# Altium PCB PCBv2.PcbDoc (part 2 of 2)
Units mil, origin at the board's own origin, x right, y up, seen from the top; angles counter-clockwise.
Board outline 6515 x 2205 mil, 4 copper layers (Top Layer, GND, Power, Bottom Layer), stack 30.8 mil thick; 165 components, 130 nets, 555 pads, 55 vias.
Unrouted connection lines stored in the file: 261.
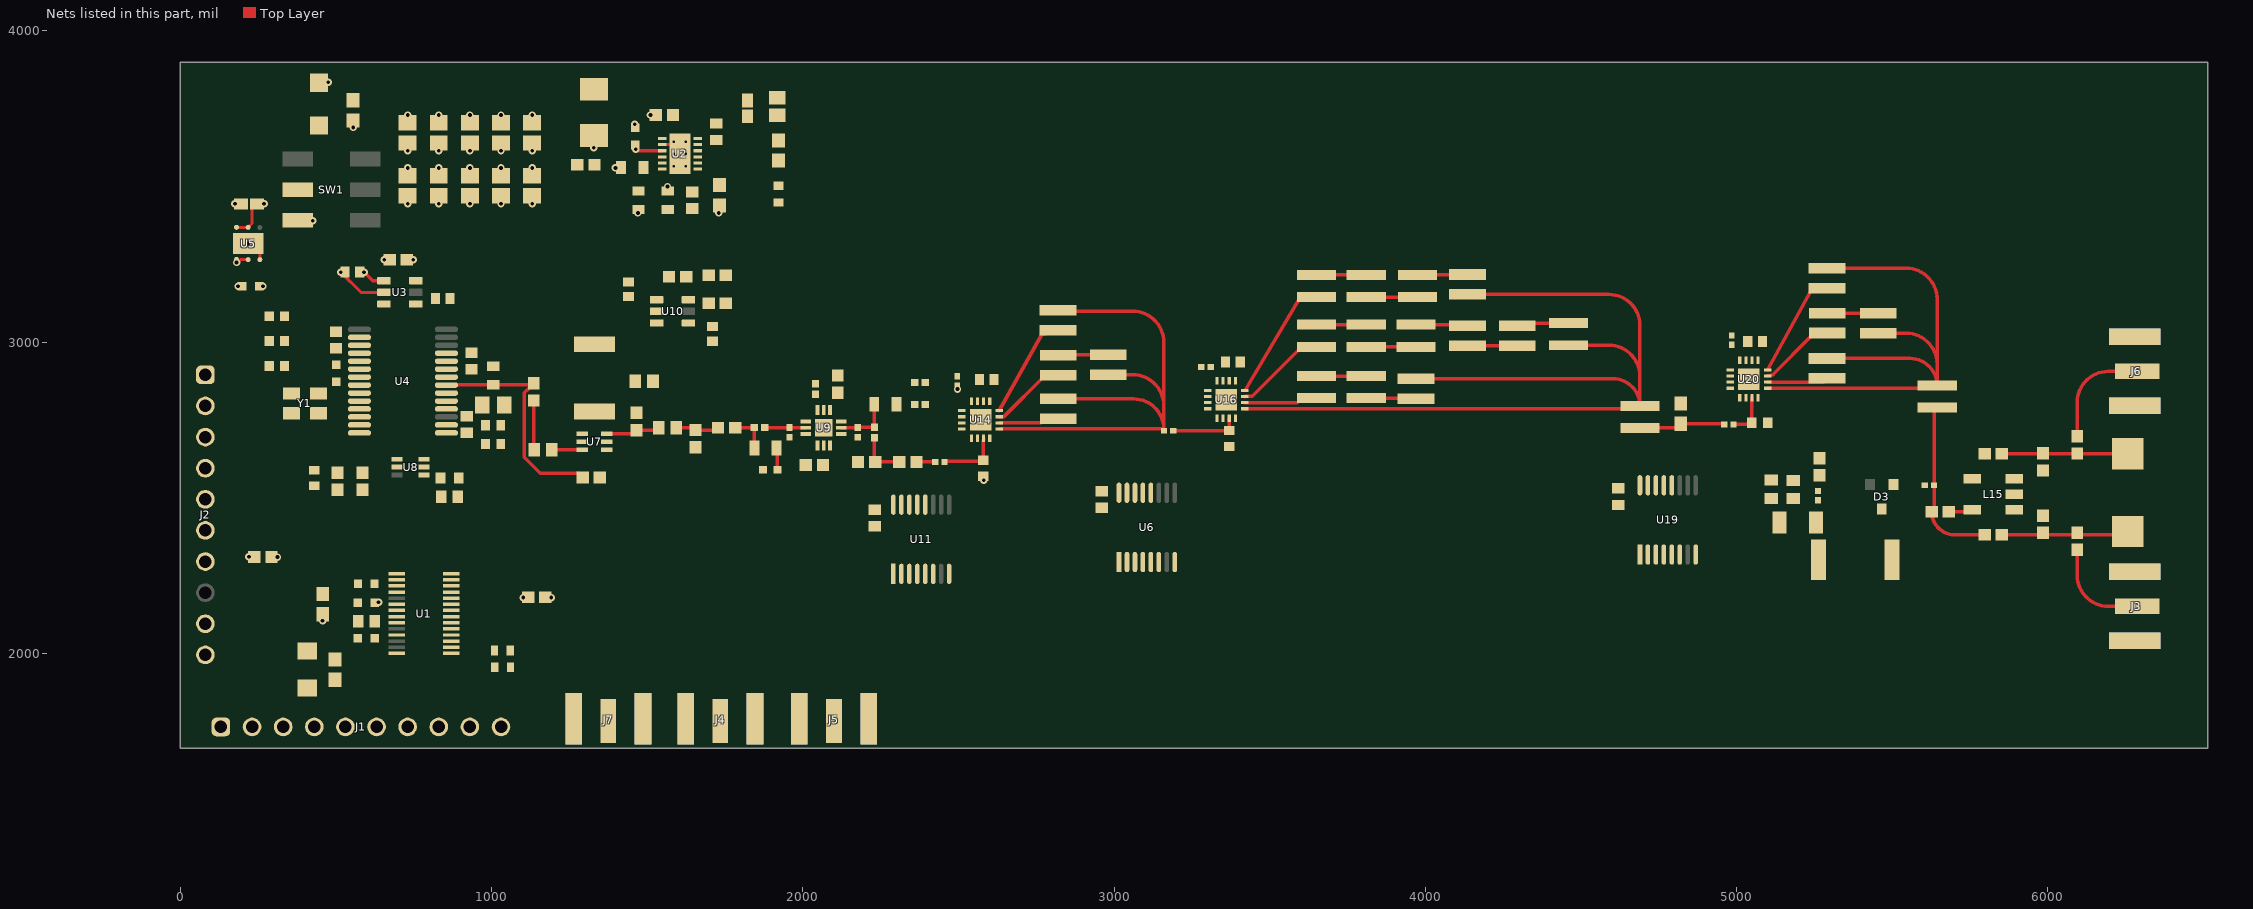
[diagram p4: the nets of this part, all layers, seen from the top]

## Part data (continued)
C10: library part CMP-08246-004908-1, "Multilayer Ceramic Capacitors 4.7μF ±10% 25V X5R SMD 0805", Capacitance=4.7uF, Case Code (Imperial)=0805, Case Code (Metric)=2012, Dielectric=X5R, Dielectric Material=Ceramic, Max Operating Temperature=85°C, Min Operating Temperature=-55°C, Package Quantity=1, Tolerance=10%, Voltage=25V, Case/Package=0805, Depth=1.25mm, Height=1.25mm, Lead Free="Lead Free", Length=2mm, Mount="Surface Mount", Number of Pins=2, Packaging="Tape and Reel", Radiation Hardening=No, REACH SVHC="No SVHC", Resistor Type=Ceramic, RoHS Compliant=Yes, Termination=SMD/SMT, Thickness=0.057inch, Voltage Rating=25V, Voltage Rating (DC)=25V, Weight=0.000194oz, Width=1.25mm
C11 C47: library part CMP-03020-034654-1, "CAP CER 10UF 10V X5R 0603", RoHS Compliant=Yes
C12 C48: library part CMP-03020-014723-2, "CAP CER 100PF 16V NP0 0603", Capacitance="100 pF", Manufacturer=KEMET, Package=C0603C-CF, Temperature="-55°C to +125°C", Temperature Characteristic=C0G, Temperature Coefficient=30ppm/°C, Temperature Range High=+125°C, Temperature Range Low=-55°C, Tolerance=0.1, Voltage Rating="16 V", Automotive=Yes, Automotive Grade="Grade 1", Category=Cap, ComponentLink2Description=Datasheet, ComponentLink2URL=https://api.kemet.com/component-edge/download/datasheet/C0603C100J5GACAUTO.pdf, Device Class L1="Passive Components", Device Class L2=Capacitors, Device Class L3="Ceramic Capacitors", Digikey Description="CAP CER 100PF 16V NP0 0603", Height=0.87mm, Lead Free=Yes, Manufacturer Part Number=C0603C101K4GAC7867, Material=Ceramic, Octopart=https://octopart.com/c0603c101k4gac7867-kemet-1494535, RoHS=TRUE
C16: library part CMP-2006-02564-2, "Chip Multilayer Ceramic Capacitors for General Purpose, 0603, 4700pF, C0G, 30ppm/°C, 5%, 50V", Capacitance=4.7nF, Case Code (Imperial)=0603, Case Code (Metric)=1608, Dielectric=C0G, Max Operating Temperature=125°C, Min Operating Temperature=-55°C, Package Quantity=4000, Tolerance=5%, Voltage Rating=50V, Case/Package=0603, Height=0.8mm, Lead Free="Lead Free", Length=1.6mm, Material=Ceramic, Mount="Surface Mount", Packaging="Tape and Reel", REACH SVHC="No SVHC", Termination=SMD/SMT, Thickness=0.035inch, Voltage Rating (DC)=50V, Width=0.8mm
C21 C26 C28 C29: library part CMP-06035-008289-1, "Chip Multilayer Ceramic Capacitors for General Purpose, 0402, 0.10uF, X5R, 15%, 10%, 100V", Capacitance=100nF, Case Code (Imperial)=0402, Case Code (Metric)=1005, Dielectric=X5R, Max Operating Temperature=85°C, Min Operating Temperature=-55°C, Package Quantity=10000, Tolerance=10%, Voltage Rating=100V, Case/Package=0402, Height=0.5mm, Lead Free="Lead Free", Length=0.039inch, Mount="Surface Mount", Packaging="Tape and Reel", REACH SVHC="No SVHC", Termination=SMD/SMT, Thickness=0.022inch, Voltage Rating (DC)=100V, Weight=0.000212oz, Width=0.5mm
C22: library part CMP-06035-012343-1, "Ceramic Capacitor for Automotive 300pF ±1% 50VDC C0G 0402 Paper T/R"
C27 C43 C46: library part CMP-2008-03723-3, "Ceramic Capacitor for Automotive 10nF ±10% 50VDC X7R 0402 Paper T/R", Capacitance=10nF, Case Code (Imperial)=0402, Case Code (Metric)=1005, Dielectric=X7R, Max Operating Temperature=125°C, Min Operating Temperature=-55°C, Package Quantity=1, Ratings=AEC-Q200, Tolerance=10%, Voltage=50V, Case/Package=0402, Depth=0.5mm, Height=0.5mm, Lead Free="Lead Free", Length=1mm, Mount="Surface Mount", Packaging="Tape and Reel", Radiation Hardening=No, REACH SVHC="No SVHC", Termination=SMD/SMT, Thickness=0.022inch, Voltage Rating=50V, Voltage Rating (DC)=50V, Width=0.02inch
C30 C44 C49: library part CMP-2006-03022-3, "CAP CER 1000PF 50V X7R 0603", Capacitance=1nF, Manufacturer=KEMET, Package=C0603C-CF, Temperature="-55°C to +125°C", Temperature Characteristic=X7R, Temperature Coefficient=30ppm/°C, Temperature Range High=+125°C, Temperature Range Low=-55°C, Tolerance=0.1, Voltage Rating="50 V", Automotive=Yes, Automotive Grade="Grade 1", Category=Cap, ComponentLink2Description=Datasheet, ComponentLink2URL=https://api.kemet.com/component-edge/download/datasheet/C0603C100J5GACAUTO.pdf, Device Class L1="Passive Components", Device Class L2=Capacitors, Device Class L3="Ceramic Capacitors", Digikey Description="CAP CER 1000PF 50V X7R 0603", Height=0.87mm, Lead Free=Yes, Manufacturer Part Number=C0603C102K5RACTU, Material=Ceramic, Mouser Description="Capacitor; Ceramic; Cap; 1000pF; Tol 10%; SMT; Vol-Rtg 50V; X7R; Tape and Reel", Octopart=https://octopart.com/c0603c102k5ractu-kemet-144878, RoHS=TRUE
C32: library part CMP-2006-01326-1, Capacitance=18nF, Manufacturer=Vitramon, Part Number=VJ0603Y183KXAAC
C33 C34: library part CMP-2006-01326-1, Manufacturer=Vitramon, Part Number=VJ0603Y183KXAAC
C35: library part CMP-2100-03600-2, "CAP CER 10000PF 50V X7R 0603", Capacitance="10 nF", Manufacturer=YAGEO, Package=CC0603-DA, Temperature="-55°C to +125°C", Temperature Characteristic=X7R, Temperature Coefficient=15%, Temperature Range High=+125°C, Temperature Range Low=-55°C, Tolerance=0.1, Voltage="50 V", Automotive=No, Category=Cap, ComponentLink2Description=Datasheet, ComponentLink2URL=http://www.yageo.com/documents/recent/UPY-GPHC_X7R_6.3V-to-50V_18.pdf, Device Class L1="Passive Components", Device Class L2=Capacitors, Device Class L3="Ceramic Capacitors", Digikey Description="CAP CER 10000PF 50V X7R 0603", Footprint Url=http://www.yageo.com/exep/pages/download/literatures/UPY-C_GEN_24.pdf, Height=0.9mm, Lead Free=Yes, Manufacturer Part Number=CC0603KRX7R9BB103, Material=Ceramic, Mouser Description="Multilayer Ceramic Capacitor, CC Series, 0.01 - F, - 10%, X7R, 50 V, 0603 [1608 Metric]", Octopart=https://octopart.com/cc0603krx7r9bb103-yageo-192938, RoHS=TRUE, Voltage Rating="50 V"
C36 C37: library part CMP-2008-04639-2, "Chip Multilayer Ceramic Capacitors for General Purpose, 0402, 0.10uF, X7R, 15%, 10%, 50V", Capacitance=100nF, Case Code (Imperial)=0402, Case Code (Metric)=1005, Dielectric=X7R, Dielectric Material=Ceramic, Max Operating Temperature=125°C, Min Operating Temperature=-55°C, Package Quantity=10000, Tolerance=10%, Voltage=50V, Case/Package=0402, Depth=0.5mm, Dissipation Factor=0.025%, Height=0.5mm, Lead Free="Lead Free", Length=1mm, Material=Ceramic, Mount="Surface Mount", Packaging="Tape and Reel", REACH SVHC="No SVHC", Resistor Type=Ceramic, Termination=SMD/SMT, Thickness=0.022inch, Voltage Rating=50V, Voltage Rating (DC)=50V, Weight=0.000212oz, Width=0.5mm
C38 C39 C40: library part CMP-2008-04254-2, "Chip Multilayer Ceramic Capacitors for General Purpose, 0402, 1000pF, C0G, 30ppm/°C, 5%, 50V", Capacitance=1nF, Case Code (Imperial)=0402, Case Code (Metric)=1005, Dielectric=C0G, Dielectric Material=Ceramic, Insulation Resistance=10GR, Max Operating Temperature=125°C, Min Operating Temperature=-55°C, Package Quantity=1, Temperature Coefficient=30ppm/°C, Tolerance=5%, Voltage=50V, Case/Package=0402, Depth=0.5mm, Height=0.5mm, Lead Free="Lead Free", Length=1mm, Material=Ceramic, Mount="Surface Mount", Number of Pins=2, Packaging="Tape and Reel", Radiation Hardening=No, REACH SVHC="No SVHC", Termination=SMD/SMT, Thickness=0.022inch, Voltage Rating=50V, Voltage Rating (DC)=50V, Width=0.5mm
C41 C42: library part CMP-1034-00010-2, Manufacturer=Murata, Part Number=GRM1555C1HR40WA01D
C45: library part CMP-06035-034328-1, "Ceramic Capacitor for Automotive 30pF  ±5% 100VDC C0G 0603 Paper T/R", Capacitance=30pF, Case Code (Imperial)=0603, Case Code (Metric)=1608, Dielectric=C0G, Max Operating Temperature=125°C, Min Operating Temperature=-25°C, Package Quantity=4000, Ratings=AEC-Q200, Tolerance=5%, Voltage Rating=100V, Case/Package=0603, Depth=0.8mm, Height=0.8mm, Length=1.6mm, Mount="Surface Mount", Packaging="Tape and Reel", Radiation Hardening=No, Termination=SMD/SMT, Thickness=0.035inch, Voltage Rating (DC)=100V, Width=0.8mm
C61 C62 C63 C64 C65 C66 C67 C68 C69 C70: library part CMP-06035-052658-1, "Chip Multilayer Ceramic Capacitors for General Purpose, 0805, 100uF, X5R, 15%, 20%, 6.3V", Capacitance=100uF, Dielectric=X5R, Tolerance=20%, Voltage Rating (DC)=6.3V, Lead Free="Lead Free", Length=2mm, Thickness=1.25mm, Width=1.25mm
D1: library part CMP-1426-00017-3, "Led, Red, 630 Nm, 1.9 V, 30 Ma, 60 Mcd Rohs Compliant: Yes", Case Code (Imperial)=1206, Case Code (Metric)=3216, Color=Red, Forward Current=100mA, Forward Voltage=1.9V, Max Operating Temperature=85°C, Max Reverse Voltage (DC)=5V, Min Operating Temperature=-40°C, Test Current=20mA, Case/Package=1206, Dominant Wavelength=630nm, Height=680µm, Length=3.2mm, Lens Style="Clear, Rectangular", Luminous Intensity=60mcd, Mount="Surface Mount", Packaging="Tape and Reel", Peak Wavelength=645nm, REACH SVHC=Unknown, RoHS=Compliant, Viewing Angle=140°, Wavelength=630nm, Width=1.6mm
D2: library part CMP-2000-05061-2, "LED GREEN DIFFUSED 1206 SMD", Colour=Green, Forward Current=20mA, Forward Voltage=2.2V, Manufacturer=Broadcom, Max Junction Temp=+95°C, Power Dissipation=65mW, Reverse Voltage=5V, Temperature="-40°C to +85°C", Temperature Range High=+85°C, Temperature Range Low=-40°C, Automotive=No, Category=Diode, ComponentLink2Description=Datasheet, ComponentLink2URL=https://docs.broadcom.com/docs/AV02-0551EN, Device Class L1=Optoelectronics, Device Class L2=LEDs, Device Class L3=unset, Digikey Description="LED GREEN DIFFUSED 1206 SMD", Height=1.2mm, Ipc Land Pattern Name=DIOCP320160X55, Lead Free=Yes, Led Orientation="Top View", Luminous Intensity=15mcd, Manufacturer Part Number=HSMG-C150, Mouser Description="LED Uni-Color Green 570nm 2-Pin Chip LED T/R", Octopart=https://octopart.com/hsmg-c150-broadcom-71131304, Package=HSMG-C150, Peak Emmision Wavelength=570nm, RoHS=TRUE, Viewing Angle=170°, Wavelength=572nm
D3: library part CMP-1054-00156-1, "Switching Diode, 3-Pin SOT-23, Pb-Free, Tape and Reel", Manufacturer="On Semiconductor", ComponentLink1Description="Manufacturer URL", ComponentLink1URL=http://www.onsemi.com/, ComponentLink2Description=Datasheet, ComponentLink2URL=http://www.onsemi.com/pub_link/Collateral/BAS16LT1-D.PDF, ComponentLink3Description="Package Specification", ComponentLink3URL=http://www.onsemi.cn/pub_link/Collateral/318-08.PDF, Configuration=Single, DatasheetVersion="Rev. 10", IF Max (A)=0.2, Mounting Technology="Surface Mount", PackageDescription="3-Pin Small Outline Transistor, Body 2.92 x 1.3 mm, Pitch 0.95 mm", PackageReference=SOT-23-3-318-08, PackageVersion="Rev. AP, 11/2009", Packing="Tape and Reel", PartNumber=BAS16LT1G, RoHS=TRUE, trr Max (ns)=6
J1 J2: library part CMP-1502-01419-3, Color=Black, Contact Resistance=20mΩ, Current Rating=3A, Flammability Rating="UL94 V-0", Insulation Resistance=1GΩ, Max Operating Temperature=125°C, Min Operating Temperature=-40°C, Operating Supply Voltage=250V, Connector Type="Header, Socket", Contact Gender=Female, Contact Material=Copper, Contact Plating=Gold, Gender=Female, Height=8.5mm, Housing Material=PBT, Insulation=Insulated, Lead Pitch=2.54mm, Length=25.9mm, Mount="Through Hole", NexarPartId=18818161, Number of Contacts=10, Number of Pins=10, Number of Positions=10, Number of Rows=1, Pitch=2.54mm, REACH SVHC=Unknown, RoHS=Compliant, Termination="Through Hole", Voltage Rating=250V, Width=25.9mm
J3 J4 J5 J6 J7: library part CMP-02754-000006-1, "CONN SMA JACK STR 50OHM EDGE MNT", Case/Package=SMA, Dielectric Material=PTFE, Housing Color=Gold, Max Frequency=6GHz, Max Operating Temperature=125°C, Min Operating Temperature=-65°C, Package Quantity=1, Voltage Rating=335V, Body Material=Brass, Body Plating=Gold, Center Contact Plating=Gold, Connector Type=SMA, Contact Material=Copper, Contact Plating=Gold, Depth=13.33mm, Fastening Type=Threaded, Impedance=50R, Insulation Material=Polytetrafluoroethylene, Length=6.35mm, Mount=Edge, Orientation=Straight, Packaging=Tray, Radiation Hardening=No, RoHS Compliant=Yes, Series=SMA, Termination=Solder
L1: library part CMP-02424-000576-1, "Fixed Inductors Commercial Low DCR Series SMT 4.7uH 1.7A 105mΩ 20%", Case/Package=1616, Current Rating=1.7A, DC Resistance (DCR)=105mR, Inductance=4.7uH, Inductance Tolerance=20%, Max Operating Temperature=125°C, Min Operating Temperature=-55°C, Package Quantity=4000, Saturation Current=1.75A, Self Resonant Frequency=29MHz, Test Frequency=100kHz, Contact Plating=Tin, Core Material=Ferrite, Depth=4.31mm, Height=2mm, Height - Seated (Max)=0.079inch, Lead Free="Lead Free", Length=4.7mm, Max DC Current=1.7A, Military Standard=Not, Mount="Surface Mount", Number of Pins=1616, Packaging="Tape and Reel", Radiation Hardening=No, RMS Current (Irms)=1.7A, Shielding=Shielded, Termination=SMD/SMT, Tolerance=20%, Width=4.06mm
L2: library part CMP-06042-016197-1, "Multilayer Type Inductor for General Circuits, 0603 (1608), 820nH, 10%, 2.1Ω, 35mA", Case Code (Imperial)=0603, Case Code (Metric)=1608, Current Rating=35mA, DC Resistance (DCR)=2.1R, Inductance=820nH, Max Operating Temperature=85°C, Min Operating Temperature=-40°C, Package Quantity=1, Self Resonant Frequency=85MHz, Test Frequency=25MHz, Tolerance=10%, Case/Package=0603, Core Material=Ferrite, DC Current=35mA, Depth=0.95mm, Height=0.8mm, Height - Seated (Max)=0.037inch, Lead Free="Lead Free", Length=1.6mm, Max DC Current=35mA, Military Standard=Not, Mount="Surface Mount", Packaging="Tape and Reel", Q Factor=15, Radiation Hardening=No, REACH SVHC="No SVHC", RoHS Compliant=Yes, Series=LQM18N, Shielding=Shielded, Termination=SMD/SMT, Width=0.031inch
L3: library part CMP-06042-001639-1, "0805LS-152XJEC Coilcraft", Case Code (Imperial)=0805, Case Code (Metric)=2012, Current Rating=85mA, DC Resistance (DCR)=5.33R, Inductance=1.5uH, Max Operating Temperature=85°C, Min Operating Temperature=-40°C, Package Quantity=3000, Resistor Type=Wirewound, Self Resonant Frequency=350MHz, Test Frequency=10MHz, Tolerance=5%, Case/Package=0805, Core Material=Ferrite, DC Current=85mA, Depth=1.4mm, Height=0.9mm, Height - Seated (Max)=0.039inch, Length=2mm, Max DC Current=85mA, Military Standard=Not, Mount="Surface Mount", Packaging="Tape and Reel", Q Factor=35, Radiation Hardening=No, Shielding=Unshielded, Termination=SMD/SMT, Weight=0.000282oz, Width=0.047inch
L4: library part CMP-06042-001639-1, "Wire Wound Ferrite type RF Inuctor 1.5uH ±5% 85mA 5.33Ω 0805 (2012)", Case Code (Imperial)=0805, Case Code (Metric)=2012, Current Rating=85mA, DC Resistance (DCR)=5.33R, Inductance=1.5uH, Max Operating Temperature=85°C, Min Operating Temperature=-40°C, Package Quantity=3000, Resistor Type=Wirewound, Self Resonant Frequency=350MHz, Test Frequency=10MHz, Tolerance=5%, Case/Package=0805, Core Material=Ferrite, DC Current=85mA, Depth=1.4mm, Height=0.9mm, Height - Seated (Max)=0.039inch, Length=2mm, Max DC Current=85mA, Military Standard=Not, Mount="Surface Mount", Packaging="Tape and Reel", Q Factor=35, Radiation Hardening=No, Shielding=Unshielded, Termination=SMD/SMT, Weight=0.000282oz, Width=0.047inch
L5 L16: library part Inductor, "XGL3014-331MEC General Purpose Inductor, 0.33uH, 20%, 1 Element, Composite-Core, SMD, 1212 Fixed Inductors     1212  20% 1.4mm", SimulationGenericComponent=True
L9 L10 L17 L19 L24: library part Inductor, "General Purpose Inductor, XGL3512-122MEC 1.2uH, 20%, 1 Element, Composite-Core, SMD, 1413 Fixed Inductors       20% 1.2mm", SimulationGenericComponent=True
L11 L27 L29 L30 L31 L36: library part Inductor, "XGL3512-621MEC General Purpose Inductor, 0.62uH, 20%, 1 Element, Composite-Core, SMD, 1413 Fixed Inductors       20% 1.2mm", SimulationGenericComponent=True
L12 L14 L25 L26 L28 L32 L35 L37: library part Inductor, SimulationGenericComponent=True
L15: library part CMP-97513-000003-1, "BALUN 300KHZ-200MHZ 1:1 6SMD", Case/Package=SMD/SMT, Max DC Current=500mA, Max Operating Temperature=85°C, Min Operating Temperature=-40°C, Package Quantity=2000, Power Rating=500mW, Depth=3.81mm, Height=2.67mm, Insertion Loss=1.5dB, Lead Free="Lead Free", Lead/Base Style="Gull Wing", Length=3.81mm, Mount="Surface Mount", Number of Pins=5, Packaging="Tape and Reel", Radiation Hardening=No, Termination=SMD/SMT, Turns Ratio=1:1, Width=3.81mm
L33 L34: library part Inductor, "General Purpose Inductor, 0.2uH, 20%, 1 Element, Composite-Core, SMD, 1212 Fixed Inductors     1212  20% 1.4mm", SimulationGenericComponent=True
R1 R25: library part CMP-2000-06942-1, "Chip Resistor, 4.7 KOhm, +/- 1%, 0.1 W, -55 to 155 degC, 0603 (1608 Metric), RoHS, Tape and Reel", Case Code - in=0603, Case Code - mm=1608, Manufacturer=Yageo, Operating Temperature Range=-55Cto+155C, Package Description="2-Pin Surface Mount Device, Body 1.6 x 0.8 mm", Power Rating=100mW, Resistance=4.7k, Temperature Coefficient=100PPM/C, Tolerance=1%, Voltage Rating=50V, Datasheet URL=http://www.yageo.com/documents/recent/PYu-RC_Group_51_RoHS_L_7.pdf, Datasheet Version="Rev. 7, 05/2017", Manufacturer URL=http://www.yageo.com/, Mounting Technology=SurfaceMount, Package Reference=0603, Packaging=Reel, Product=ThickFilmResistorsGeneralPurpose, Series=RC, Termination Style=SMD/SMT
R2: library part CMP-08839-028747-1, "3.3kΩ ±1% 0.25W 0603 Anti-Surge Chip Resistor AEC-Q200", Case/Package=0603, Max Operating Temperature=155°C, Max Power Dissipation=250mW, Min Operating Temperature=-55°C, Resistance=3.3kΩ, Resistor Type="Thick Film", Temperature Coefficient=100ppm/°C, Tolerance=1%, Features="Automotive AEC-Q200", Number of Terminations=2, Packaging="Tape and Reel", RoHS Compliant=Yes, Series=ESR
R3: library part CMP-2000-03018-2, "RES 111K OHM 0.5% 1/10W 0603", Case Code (Imperial)=0603, Case Code (Metric)=1608, Max Operating Temperature=155°C, Max Power Dissipation=100mW, Min Operating Temperature=-55°C, Package Quantity=10, Resistance=111kΩ, Temperature Coefficient=100ppm/°C, Tolerance=1%, Voltage Rating=75V, Case/Package=0603, Composition="Thick Film", Contact Plating=Tin, Depth=0.85mm, Features="Automotive AEC-Q200", Height=0.02inch, Lead Free="Lead Free", Length=1.55mm, Military Standard=Not, Mount="Surface Mount", Number of Terminations=2, Packaging="Tape and Reel", Power Rating=100mW, Radiation Hardening=No, Termination=SMD/SMT, Voltage Rating (DC)=75V, Weight=7.1E-05oz, Width=0.033inch
R4 R9 R14 R28 R29 R30 R31 R45 R46: library part CMP-26527-006412-1, "0Ω ±0 0.1W 0603 Thick Film Chip Resistor AEC-Q200 compliant", Case/Package=0603, Max Operating Temperature=155°C, Max Power Dissipation=100mW, Min Operating Temperature=-55°C, Resistance=0Ω, Resistor Type="Thick Film", Contact Plating=Tin, Features="Automotive AEC-Q200", Height=0.022inch, Length=0.061inch, Mount="Surface Mount", Number of Terminations=2, Packaging="Tape and Reel", Radiation Hardening=No, RoHS Compliant=Yes, Series=RMCF, Width=0.031inch
R5: library part CMP-2000-03475-2, "RES Thick Film, 57.6kΩ, 1%, 0.1W, 100ppm/°C, 0603", Case Code (Imperial)=0603, Case Code (Metric)=1608, Max Operating Temperature=155°C, Max Power Dissipation=100mW, Min Operating Temperature=-55°C, Package Quantity=10, Resistance=57.6kΩ, Temperature Coefficient=100ppm/°C, Tolerance=1%, Voltage Rating=75V, Case/Package=0603, Composition="Thick Film", Contact Plating=Tin, Depth=0.85mm, Features="Automotive AEC-Q200", Height=0.45mm, Length=1.55mm, Military Standard=Not, Number of Pins=2, Number of Terminations=2, Packaging="Tape and Reel", Power Rating=100mW, Radiation Hardening=No, Termination=SMD/SMT, Weight=7.1E-05oz, Width=0.85mm
R6: library part CMP-03412-022585-2, "RES 11.3KΩ 1.00% 0.1W 0603", RoHS Compliant=Yes
R7: library part CMP-02407-006337-1, "RES Thick Film, 86.6kΩ, 1%, 0.33W, 100ppm/°C, 0603", Case/Package=0603, Max Power Dissipation=250mW, Package Quantity=5000, Resistance=86.6kΩ, Temperature Coefficient=100ppm/°C, Tolerance=1%, Composition="Thick Film", Features="Automotive AEC-Q200", Height=0.022inch, Lead Free="Lead Free", Length=0.063inch, Number of Terminations=2, Packaging="Tape and Reel", Width=0.033inch
R8 R10 R11 R12 R13 R15 R16 R18 R19 R32 R38 R39 R40 R41 R48 R58 R59: library part CMP-26527-006412-1, "0Ω ±0 0.1W 0603 Thick Film Chip Resistor AEC-Q200 compliant", Case/Package=0603, Max Operating Temperature=155°C, Max Power Dissipation=100mW, Min Operating Temperature=-55°C, Resistance=0R, Resistor Type="Thick Film", Contact Plating=Tin, Features="Automotive AEC-Q200", Height=0.022inch, Length=0.061inch, Mount="Surface Mount", Number of Terminations=2, Packaging="Tape and Reel", Radiation Hardening=No, RoHS Compliant=Yes, Series=RMCF, Width=0.031inch
R17: library part CMP-26527-000574-1, "200Ω ±5% 1W 2512 Thick Film Chip Resistor AEC-Q200 compliant", Case Code (Imperial)=2512, Case Code (Metric)=6432, Max Operating Temperature=155°C, Max Power Dissipation=1W, Min Operating Temperature=-55°C, Resistance=200R, Resistor Type="Thick Film", Temperature Coefficient=200ppm/°C, Tolerance=5%, Case/Package=2512, Construction=Rectangular, Contact Plating=Tin, Depth=3.2mm, Features="Automotive AEC-Q200", Height=0.028inch, Lead Free="Lead Free", Length=0.248inch, Military Standard=Not, Mount="Surface Mount", Number of Terminations=2, Packaging="Tape and Reel", Power Rating=1W, Radiation Hardening=No, RoHS Compliant=Yes, Series=RMCF, Size Code=2512, Width=0.126inch
R20 R22: library part CMP-2000-00180-1, "ERJ-3EKF1001V", Manufacturer=Panasonic, Resistance=1K, Part Number=ERJ-3EKF1001V
R21: library part CMP-2000-03436-2, "RES Thick Film, 50Ω, 1%, 0.1W, 100ppm/°C, 0603 CRCW060350R0FKEA", Case Code (Imperial)=0603, Case Code (Metric)=1608, Max Operating Temperature=155°C, Min Operating Temperature=-55°C, Package Quantity=5000, Power Rating=100mW, Resistance=50, Temperature Coefficient=100ppm/°C, Tolerance=1%, Voltage Rating=75V, Case/Package=0603, Composition="Thick Film", Contact Plating=Tin, Depth=0.85mm, Height=0.45mm, Lead Free="Lead Free", Length=1.55mm, Military Standard=Not, Mount="Surface Mount", Number of Pins=2, Packaging="Tape and Reel", Radiation Hardening=No, REACH SVHC="No SVHC", Termination=SMD/SMT, Voltage Rating (DC)=75V, Weight=7.1E-05oz, Width=0.85mm
R23: library part Resistor, "Fixed Resistor, Thin Film, 0.125W, 25ohm, 150V, 0.1% +/-Tol, 25ppm/Cel, Surface Mount, 0805", Case/Package=0805, Manufacturer="Yageo Group", Manufacturer Part Number=RT0805BRD0725RL, Max Operating Temperature=155°C, Min Operating Temperature=-55°C, Power Rating=125mW, Temperature Coefficient=25ppm/°C, Tolerance=0.1%, Working Voltage=150V, Category="Chip SMD Resistors", China RoHS=Non-Compliant, ComponentLink1Description=https://datasheet.octopart.com:443/RT0805BRD0725RL-Yageo-Group-datasheet-176402239.pdf?src-supplier=IHS, ComponentLink1URL=https://datasheet.octopart.com:443/RT0805BRD0725RL-Yageo-Group-datasheet-176402239.pdf?src-supplier=IHS, ComponentLink2Description=https://datasheet.octopart.com:443/RT0805BRD0725RL-Yageo-datasheet-141265893.pdf?src-supplier=IHS, ComponentLink2URL=https://datasheet.octopart.com:443/RT0805BRD0725RL-Yageo-datasheet-141265893.pdf?src-supplier=IHS, ComponentLink3Description=https://datasheet.octopart.com/RT0805BRD0725RL-Yageo-datasheet-86813807.pdf, ComponentLink3URL=https://datasheet.octopart.com/RT0805BRD0725RL-Yageo-datasheet-86813807.pdf, ComponentLink4Description=http://sigma.octopart.com:80/conflict_mineral_statement/Yageo-company-3.pdf?src-supplier=Compliance+Statements, ComponentLink4URL=http://sigma.octopart.com:80/conflict_mineral_statement/Yageo-company-3.pdf?src-supplier=Compliance+Statements, ComponentLink5Description=http://sigma.octopart.com:80/rohs_statement/Yageo-company-2.pdf?src-supplier=Compliance+Statements, ComponentLink5URL=http://sigma.octopart.com:80/rohs_statement/Yageo-company-2.pdf?src-supplier=Compliance+Statements, Composition="Thin Film", Country of Origin="Mainland China, Taiwan", Export Control Classification Number (ECCN) Code=EAR99, Harmonized Tariff Schedule (HTS) Code=8533.21.00.30, Height=500µm, Introduction Date=2020-04-21, Length=2mm, Lifecycle Status=Production, Mounting Technology="Surface Mount", Number of Terminals=2, Packaging="Tape & Reel", Pricing="5000=0.0492, 10000=0.04895, 20000=0.04869, 40000=0.04844, 80000=0.04819 (USD)", REACH SVHC=Unaffected, RoHS=Compliant, SimulationGenericComponent=True, Supplier=Avnet, Supplier Part Number=RT0805BRD0725RL, TC1=0, TC2=0, Width=1.25mm
R24 R35 R36: library part CMP-03211-009884-1, "CRGCQ 0603 10K 5%", Ambient Temperature Range High=+70°C, Manufacturer="TE Connectivity", Package=CRGCQ0603, Power Rating=0.1W, Resistance=10KΩ, Temperature="-55°C to +155°C", Temperature Coefficient=±100ppm/°C, Temperature Range High=+155°C, Temperature Range Low=-55°C, Tolerance=0.05, Voltage Rating=75V, Category=Res, ComponentLink2Description=Datasheet, ComponentLink2URL=https://www.te.com/commerce/DocumentDelivery/DDEController?Action=showdoc&DocId=Data+Sheet%7F1773204-3%7F1%7Fpdf%7FEnglish%7FENG_DS_1773204-3_1.pdf%7F4-2176339-923, Composition="Thick Film", Device Class L1="Passive Components", Device Class L2=Resistors, Device Class L3="Chip SMD Resistors", Digikey Description="CRGCQ 0603 10K 5%", Height=0.55mm, Ipc Land Pattern Name=RESC16080X45, Lead Free=Yes, Manufacturer Part Number=CRGCQ0603J10K, Mouser Description="Res Thick Film 0603 10K Ohm 5% 0.1W(1/10W) ±100ppm/C Pad SMD Automotive T/R", Octopart=https://octopart.com/crgcq0603j10k-te+connectivity-91018097, RoHS=TRUE, Series=CRGCQ
R26: library part CMP-2000-01399-1, Manufacturer="KOA Speer", Part Number=RK73H1JTTD3003F
R27: library part CMP-2003-01671-1, Manufacturer="KOA Speer", Part Number=SG73P2BTTD2002F
R33: library part CMP-2000-01100-1, Manufacturer="KOA Speer", Part Number=RK73H1JTTD1003F
R34 R55: library part CMP-02407-003593-1, "RES Thick Film, 220Ω, 1%, 0.33W, 100ppm/°C, 0603", Case Code (Imperial)=0603, Case Code (Metric)=1608, Max Operating Temperature=155°C, Max Power Dissipation=250mW, Min Operating Temperature=-55°C, Package Quantity=5000, Resistance=220Ω, Temperature Coefficient=100ppm/°C, Tolerance=1%, Voltage Rating=75V, Case/Package=0603, Composition="Thick Film", Contact Plating=Tin, Depth=0.85mm, Features="Automotive AEC-Q200", Height=0.45mm, Lead Free="Lead Free", Length=1.6mm, Military Standard=Not, Mount="Surface Mount", Number of Terminations=2, Packaging="Tape and Reel", Power Rating=250mW, Radiation Hardening=No, Termination=SMD/SMT, Voltage Rating (DC)=75V, Weight=7.1E-05oz, Width=0.033inch
R37: "10K 2W", Manufacturer_Name="Bourns Electronics", Copyright="Copyright (C) 2026 Ultra Librarian. All rights reserved.", Manufacturer_Part_Number=CRM2512-JW-103ELF
R42 R43 R44: library part CMP-1012-00849-3, "RES SMD 1M OHM 1% 1/10W 0603", Case Code (Imperial)=0603, Case Code (Metric)=1608, Max Operating Temperature=155°C, Max Power Dissipation=100mW, Min Operating Temperature=-55°C, Package Quantity=1, Resistance=1MR, Resistance Tolerance=1%, Resistor Type="Thick Film", Temperature Coefficient=100ppm/°C, Voltage Rating=75V, Case/Package=0603, Construction=Rectangular, Contact Plating=Tin, Depth=0.8mm, Features="Automotive AEC-Q200", Height=0.022inch, Lead Free="Lead Free", Length=1.6mm, Military Standard=Not, Mount="Surface Mount", Number of Pins=2, Number of Terminations=2, Packaging="Tape and Reel", Power Rating=100mW, Radiation Hardening=No, REACH SVHC="No SVHC", RoHS Compliant=Yes, Series=ERJ, Size Code=0603, Termination=SMD/SMT, Tolerance=1%, Voltage Rating (DC)=75V, Width=0.8mm
R47: library part CMP-05494-120702529-1, "FCHP0402E50R0BBT1 SMD Chip Resistor, 50 Ohm, ± 0.1%, 1 W, 0402 [1005 Metric], Thin Film, High Frequency", Case/Package=0402, Max Operating Temperature=155°C, Min Operating Temperature=-55°C, Power Rating=1W, Resistance=50Ω, Temperature Coefficient=25ppm/°C, Tolerance=0.1%, Voltage Rating=30V, Composition="Thin Film", Height=419.1µm, NexarPartId=120702529, Schedule B=8533210045
R50: library part CMP-2000-00180-1, Manufacturer=Panasonic, Resistance=1K, Part Number=ERJ-3EKF1001V
SW1: library part CMP-03913-146831046-1, "Ws-slsv_smt Mini Slide Switch Sa"
U1: "32-MHz ArmÂ® CortexÂ®-M0+ MCU with 32-KB flash, 4-KB SRAM, 12-bit ADC 28-VSSOP -40 to 105", Manufacturer_Name="Texas Instruments", Copyright="Copyright (C) 2026 Ultra Librarian. All rights reserved.", Manufacturer_Part_Number=XMSM0L1105TDGS28R, RefDes=RefDes, Type=Embedded
U2: library part CMP-0492-00369-1, "2.5 A Synchronous Step-Up DC/DC Converter with Output Disconnect, 12-pin SON (DE-UE-12), -40 to 125 degC, Pb-Free", Manufacturer="Linear Technology", Code_JEDEC=MO-229, ComponentLink1Description="Manufacturer URL", ComponentLink1URL=http://www.linear.com/, ComponentLink2Description=Datasheet, ComponentLink2URL=http://cds.linear.com/docs/en/datasheet/3122fa.pdf, ComponentLink3Description="Package Specification", ComponentLink3URL=http://cds.linear.com/docs/en/packaging/DFN_12_05-08-1695.pdf, DatasheetVersion="Rev. A", Mounting Technology="Surface Mount", Number of Outputs=1, PackageDescription="12-Pin Plastic DFN, Body 4 x 3 mm, Pitch 0.5 mm", PackageReference=DE-UE-12, PackageVersion="Rev. D, 06/2010", PartNumber=LTC3122EDE#PBF, RoHS=TRUE
U3 U10: library part CMP-04910-000007-2, "IC PWR SWITCH N-CHAN 1:1 SOT23-6", Case/Package=SOT-23-6, Max Operating Temperature=105°C, Max Output Current=2A, Max Supply Voltage=18V, Min Operating Temperature=-40°C, Min Supply Voltage=2.7V, Package Quantity=3000, Fault Protection="Over Temperature", Interface=On/Off, Number of Channels=1, Number of Outputs=1, Output Configuration="High Side", Packaging="Cut Tape", RoHS Compliant=Yes, Series=TPS22810-Q1, Weight=0.000801oz
U4: library part CMP-0293-00041-1, "CMOS, 125 MHz Complete DDS Synthesizer, 10-Bit, Parallel, Serial, RS-28, 1500 Reel, Pb-Free", Code_JEDEC=MO-150-AH, Compliance Range (V)=1.5V, ComponentLink1Description="Manufacturer URL", ComponentLink1URL=www.analog.com, ComponentLink2Description=Datasheet, ComponentLink2URL=http://www.analog.com/static/imported-files/data_sheets/AD9850.pdf, ComponentLink3Description="Package Specification", ComponentLink3URL=http://www.analog.com/static/imported-files/packages/32122249223724RS_28.pdf, DatasheetVersion="Rev. H", FS Iout (mA nom)=20mA, I Supply total (max)=96mA, I/O Interface="Parallel, Serial", Master fclk=125MHz, PackageDescription="28-Lead Shrink Small Outline Package [SSOP]", PackageReference=RS-28, PackageVersion="revA, 1997", REFCLK Multiplier=No, Resolution (Bits)=10bit, Tuning Word Width (bits)=32bit
U5: library part CMP-12153-000011-1, "IC REG LINEAR 3.3V 2A 6DFN", Case/Package=DFN, Dropout Voltage=130mV, Max Input Voltage=6V, Max Operating Temperature=125°C, Min Input Voltage=1.25V, Min Operating Temperature=-40°C, Operating Supply Current=1mA, Output Current=2A, Output Voltage=3.3V, Package Quantity=3000, Lead Free="Lead Free", Mount="Surface Mount", Number of Outputs=1, Number of Regulators=1, Output Type=Fixed, Packaging="Tape and Reel"
U6 U11 U19: library part CMP-1633-00899-3, "IC DECODER/DEMUX 1X3:8 16TSSOP", Case/Package=TSSOP, High Level Output Current=-5.2mA, Low Level Output Current=5.2mA, Max Frequency=28MHz, Max Operating Temperature=125°C, Max Supply Current=8uA, Max Supply Voltage=6V, Min Operating Temperature=-55°C, Min Supply Voltage=2V, Output Current=25mA, Package Quantity=2000, Bandwidth=28MHz, Contact Plating=Gold, Height=1.15mm, Independent Circuits=1, Lead Free="Lead Free", Length=5mm, Logic Function=Demultiplexer, Mount="Surface Mount", Number of Bits=8, Number of Channels=1, Number of Circuits=1, Number of Elements=1, Number of Input Lines=3, Number of Inputs=3, Number of Output Lines=8, Number of Outputs=8, Number of Pins=16, Output Voltage=6V, Packaging="Tape and Reel", Polarity=Non-Inverting, Propagation Delay=265ns, Quiescent Current=8uA, Radiation Hardening=No, REACH SVHC="No SVHC", Rise Time=400ns, RoHS Compliant=Yes, Series=74HC, Supply Type=Single, Technology=CMOS, Termination=SMD/SMT, Turn-On Delay Time=265ns, Weight=0.002183oz, Width=4.4mm
U7: "DC  6 GHz Gain Block", Manufacturer_Name=Qorvo, Mouser Part Number=772-TQP369184, Datasheet Link=https://www.qorvo.com/products/d/da005471, Geometry.Height=1.1mm, Manufacturer_Part_Number=TQP369184, Mouser Price/Stock=https://www.mouser.co.uk/ProductDetail/Qorvo/TQP369184?qs=opBjA1TV900HByuIeJCWsQ%3D%3D
U8: library part CMP-0004-00364-1, "128 Tap Digital Potentiometer with I2C Interface, -40 to 125 degC, 6-pin SOT23 (DCK6), Green (RoHS & no Sb/Br)", Manufacturer="Texas Instruments", Code_JEDEC=MO-203, ComponentLink1Description="Manufacturer URL", ComponentLink1URL=http://www.ti.com/, ComponentLink2Description=Datasheet, ComponentLink2URL=http://www.ti.com/general/docs/lit/getliterature.tsp?genericPartNumber=TPL0401A-10&fileType=pdf, ComponentLink3Description="Package Specification", ComponentLink3URL=http://www.ti.com/litv/pdf/mpds114c, DatasheetVersion=SLIS144A, DNL(Max)(+/-LSB)=0.25, Eco-Plan="Green (RoHS & no Sb/Br)", INL(Max)(+/-LSB)=0.5, Interface=I2C, Mounting Technology="Surface Mount", PackageDescription="6-Pin Plastic Small Outline, Body 2 x 1.25 mm, Pitch 0.65 mm", PackageReference=DCK6, PackageVersion="4093553-4/G, 01/2007", PartNumber=TPL0401A-10DCKR, Settling Time(us)=0.152, SubFamily="Digital Potentiometer"
U9: "Integrated Circuit", Manufacturer_Name=Mini-Circuits, Datasheet Link=https://www.minicircuits.com/pdfs/PMA3-43-1W+.pdf, Height=0.89mm, Manufacturer_Part_Number=PMA3-43-1W+
U14 U16 U20: "Description", Manufacturer_Name=TagoreTech, Copyright="Copyright (C) 2026 Ultra Librarian. All rights reserved.", Manufacturer_Part_Number=TS63410K, RefDes=RefDes, Type=Type
Y1: library part CMP-03913-116855802-1, "830207044109 WE-SPXO Crystal Oscillator", Frequency=100MHz, Max Operating Temperature=85°C, Min Operating Temperature=-40°C, Height=1.2mm, Length=3.2mm, NexarPartId=116855802, Width=2.5mm

## Free pads (board coordinates)
  rect 100x100 smd paste+0 mask+0: 2(6257.48,2391.22) 2(6257.48,2641.22)

## Via types
v1: diameter 24, hole 12, Top Layer to Bottom Layer, 49 vias
v2: diameter 19.68, hole 7.87, Top Layer to Bottom Layer, 6 vias

## Nets (pads, with @x,y where several pads share a name; then routed paths per layer and width w, separated by ;. In a path a pad name is that pad's centre, name@x,y a point inside that pad or via, vN(x,y) a via of type N, cw(c..) or ccw(c..) an arc to the next point about the centre after c; other vN are vias at no path point)
3V3: C11.2 C20.2 J2.9 R12.2 R38.2 U3.1 U5.1 U5.2 | length 116.4
  Top Layer w10: v1(180.2,3256) 183.98,3256 192.98,3265 U5.2@217.6,3265 ; v1(590,3225) 617.6,3197.4 U3.1@653.82,3197.4
  other v1: 220,2310 185,3180 655,3265
3V3DDS: C13.2 C14.2 C15.2 C17.2 C18.2 C35.1 R12.1 R24.1 R35.1 U3.6 U4.6 U4.11 U4.18 U4.23 U8.1 Y1.4
  other v1: 747.66,3265.02
3V3MCU: C1.2 C2.2 C3.2 R1.2 R2.2 R25.2 R38.1 R48.1 U1.7
  other v1: 456.49,2104.35 636.49,2164.35 1101.49,2179.35 311.49,2309.35
3V3MN: C23.2 C24.2 C25.2 C27.2 C43.2 C46.2 R48.2 U6.4 U6.5 U6.16 U11.4 U11.5 U11.16 U14.16 U16.16 U19.4 U19.5 U19.16 U20.16
  other v1: 1191.49,2179.35 2496.92,2849.23
13V0: C4.1 C5.2 C7.1 C47.2 J2.7 R3.2 R11.2 U2.11 U10.1
13V0PA: C36.2 C38.2 L3.2 R8.1
D7: J1.10 U1.28 U4.25
DDS_OUT: R16.2 R21.1 R39.2 U4.21 | length 730.3
  Top Layer w11.3: U4.21@854.53,2862.05 855.18,2862.7 1004.12,2862.7 R21.1@1004.76,2863.35 1130.74,2863.35 ccw(c1130.74,2867.6) R39.2@1135,2867.6 1135,2866.66 1113.36,2845.02 1112.48,2845.02 1104.49,2837.03 1104.49,2630.14 1156.41,2578.21 R16.2@1279.19,2578.21
DDS_OUTB: R23.1 U4.20
DDS_RST: J1.9 U1.24 U4.22
DDS_WCLK: J1.7 U1.26 U4.7
"Electrode 1": pad.2@6257.48,2391.22 R9.2 R29.2 R45.2 | length 410.5
  Top Layer w11.3: R9.2@5852.68,2381.22 6247.48,2381.22 ccw(c6247.48,2391.22) pad.2@6257.48,2391.22
"Electrode 2": pad.2@6257.48,2641.22 R28.2 R31.1 R46.2 | length 404.8
  Top Layer w11.3: R28.2@5852.68,2641.22 pad.2@6257.48,2641.22
FQ_UD: J1.8 U1.25 U4.8
GND: C1.1 C2.1 C3.1 C4.2 C6.1 C7.2 C9.1 C10.2 C11.1 C12.1 C13.1 C14.1 C15.1 C16.2 C17.1 C18.1 C19.2 C20.1 C22.2 C23.1 C24.1 C25.1 C27.1 C30.1 C32.2 C35.2 C36.1 C37.1 C38.1 C41.1 C42.1 C43.1 C44.1 C45.1 C46.1 C47.1 C48.1 C49.1 C61.2 C62.2 C63.2 C64.2 C65.2 C66.2 C67.2 C68.2 C69.2 C70.2 D1.1 D2.1 J1.1 J1.2 J1.3 J1.4 J2.2 J2.3 J2.10 J3.2 J3.3 J3.4 J3.5 J4.2 J4.3 J4.4 J4.5 J5.2 J5.3 J5.4 J5.5 J6.2 J6.3 J6.4 J6.5 J7.2 J7.3 J7.4 J7.5 L15.2 L15.5 R5.1 R6.1 R7.1 R18.1 R19.1 R20.2 R21.2 R22.2 R23.2 R28.1 R33.1 R36.1 R42.1 R43.1 R44.1 R47.1 R58.1 R59.1 U1.8 U2.2 U2.10 U2.13 U3.2 U4.5 U4.10 U4.19 U4.24 U5.3 U5.7 U6.3 U6.6 U6.8 U7.1 U7.2 U7.4 U7.5 U8.2 U9.1 U9.3 U9.7 U9.9 U9.13 U10.2 U11.3 U11.6 U11.8 U14.5 U14.6 U14.8 U14.13 U14.14 U14.17 U16.5 U16.6 U16.8 U16.13 U16.14 U16.17 U19.3 U19.6 U19.8 U20.5 U20.6 U20.8 U20.13 U20.14 U20.17 Y1.2 | length 280
  Top Layer w10: v1(217.6,3317.03) 225.55,3317.03 255,3287.58 U5.3@255,3265 ; v1(515,3225) 580,3160 U3.2@653.82,3160 ; U2.2@1547.56,3634.81 1576.18,3634.81 1584.96,3643.59 v2(1584.96,3644.65)
  other v1: 2581.27,2555.99 265,3180 1470,3415 1730,3415 175,3445 730,3445 830,3445 930,3445 1030,3445 1130,3445 1565,3500 1397.6,3560 1460,3700 730,3730 830,3730 930,3730 1030,3730 1130,3730 475,3835
  other v2: 1584.96,3565.91 1624.33,3565.91 1584.96,3605.28 1624.33,3605.28 1624.33,3644.65
I2C_SCL_MCU: R1.1 U1.16 U8.3
I2C_SDA_MCU: R25.1 U1.15 U8.4
MN_OUT: C21.1 L36.2 R9.1 R30.1 | length 554
  Top Layer w11.3: L36.2@5645,2789.5 5635,2779.5 5635,2462.6 R30.1@5627.4,2455 ccw(c5701.18,2455) 5701.18,2381.22 R9.1@5797.48,2381.22
NetC5_1: C5.1 U2.12
NetC8_1: C8.1 R7.2
NetC8_2: C8.2 C9.2 U2.7
NetC10_1: C10.1 U2.5
NetC12_2: C12.2 U3.4
NetC16_1: C16.1 U1.3
NetC21_2: C21.2 D3.1 R37.1
NetC22_1: C22.1 R26.2 R27.1
NetC26_1: C26.1 R41.1 | length 59.3
  Top Layer w11.3: R41.1@2365,2615 C26.1@2424.25,2615
NetC26_2: C26.2 R42.2 U14.7 | length 192.6
  Top Layer w11.3: C26.2@2454.9,2615 2457.72,2617.81 2572.19,2617.81 R42.2@2575,2620.62 ; R42.2@2580,2620.62 2580,2684.06 2580.75,2684.81 U14.7@2580.75,2690.51
NetC28_1: C28.1 L5.2 L16.2 L28.2 U14.9 | length 1827.5
  Top Layer w11.3: U14.9@2630.91,2720.98 C28.1@3154.21,2720.98 ; L28.2@2820.93,2817.6 3063.06,2817.6 cw(c3063.06,2720.98) 3159.69,2720.98 3159.69,2795.6 ; L5.2@2820.93,3099.6 3059.69,3099.6 cw(c3059.69,2999.6) 3159.69,2999.6 3159.69,2795.6 ; L16.2@2980.93,2895.6 3059.69,2895.6 cw(c3059.69,2795.6) 3159.69,2795.6
NetC28_2: C28.2 R43.2 U16.7 | length 219.8
  Top Layer w11.3: C28.2@3190.34,2715.51 3190.65,2715.82 3370.12,2715.82 R43.2@3370.43,2716.13 3370.28,2716.29 U16.7@3370.28,2755.51
NetC29_2: C29.2 R44.2 U20.7 | length 142.6
  Top Layer w11.3: C29.2@4990.34,2735.51 5043.31,2735.51 ccw(c5043.31,2741.74) 5049.54,2741.74 5049.54,2821.27 U20.7@5049.78,2821.51
NetC30_2: C30.2 U14.15
NetC32_1: C32.1 L2.2 R17.1
NetC33_1: C33.1 L2.1 U7.6 | length 175.1
  Top Layer w11.3: U7.6@1369.37,2705.59 1454.17,2705.59 L2.1@1465,2716.42 1527.88,2716.42 C33.1@1536.46,2725
NetC33_2: C33.2 R10.2 R40.2 | length 140
  Top Layer w11.3: C33.2@1593.54,2725 1647.6,2725 R10.2@1655,2717.6 1720,2717.6 R40.2@1727.4,2725
NetC34_1: C34.1 R39.1 | length 158
  Top Layer w11.3: R39.1@1135,2812.4 1135,2656.46 C34.1@1136.46,2655
NetC34_2: C34.2 U7.3 | length 97.3
  Top Layer w11.3: C34.2@1193.54,2655 1194.13,2654.41 U7.3@1290.63,2654.41
NetC37_2: C37.2 U9.12
NetC39_1: C39.1 L4.2 R40.1 | length 125.1
  Top Layer w11.3: R40.1@1782.6,2725 C39.1@1843.13,2725 1843.85,2724.28 L4.2@1843.85,2660.72
NetC39_2: C39.2 C42.2 U9.2 | length 133.2
  Top Layer w11.3: C39.2@1876.87,2725 1877.05,2725.18 1956.7,2725.18 C42.2@1956.87,2725.35 1998.61,2725.35 1998.96,2725 U9.2@2009.79,2725
NetC40_1: C40.1 C41.2 L3.1 U9.8 | length 180.1
  Top Layer w11.3: U9.8@2123.96,2725 2124.14,2725.18 2176.7,2725.18 C41.2@2176.87,2725.35 2177.63,2726.11 2229.24,2726.11 C40.1@2230,2726.87 2229.78,2727.09 2229.78,2799.78 L3.1@2229.57,2800
NetC44_2: C44.2 U16.15
NetC48_2: C48.2 U10.4
NetC49_2: C49.2 U20.15
NetD1_2: D1.2 R34.1
NetD2_2: D2.2 R55.1
NetD3_3: D3.3 R27.2 R37.2
NetJ2_1: J2.1 SW1.2
NetJ3_1: J3.1 R45.1 | length 331.1
  Top Layer w11.3: R45.1@6095,2332.4 6095,2251.22 ccw(c6195,2251.22) 6195,2151.22 J3.1@6287.87,2151.22
NetJ4_1: J4.1 R10.1
NetJ5_1: J5.1 R13.1
NetJ6_1: J6.1 R46.1 | length 358.6
  Top Layer w11.3: R46.1@6095,2697.6 6095,2806.22 cw(c6195,2806.22) 6195,2906.22 J6.1@6287.87,2906.22
NetJ7_1: J7.1 R16.1
NetL1_2: L1.2 U2.1
NetL4_1: L4.1 R47.2 | length 69.1
  Top Layer w11.3: L4.1@1915.43,2660 1916.97,2658.47 R47.2@1916.97,2591.53
NetL5_1: L5.1 U14.12 | length 334.4
  Top Layer w11.3: U14.12@2630.91,2780.03 2767.58,3024.25 L5.1@2820.93,3035.6
NetL9_1: L9.1 U16.12 | length 395.5
  Top Layer w11.3: U16.12@3420.43,2845.03 3593.08,3134.66 L9.1@3650.43,3145.01
NetL9_2: L9.2 L10.1 | length 160
  Top Layer w11.3: L9.2@3650.43,3216.01 L10.1@3810.43,3216.01
NetL10_2: L10.2 L11.1 | length 165
  Top Layer w11.3: L10.2@3810.43,3145.01 L11.1@3975.43,3145.01
NetL11_2: L11.2 L12.1 | length 160.6
  Top Layer w11.3: L11.2@3975.43,3216.01 4133.93,3216.01 L12.1@4135.43,3217.51
NetL12_2: L12.2 L27.2 L29.1 L32.2 U16.9 | length 3133.6
  Top Layer w11.3: U16.9@3420.43,2785.98 L29.1@4628.48,2785.98 ; L32.2@3970.43,2882.51 4602.99,2882.51 cw(c4602.99,2795.5) L29.1@4690,2795.5 4690,2890.01 ; L12.2@4135.43,3153.51 4590,3153.51 cw(c4590,3053.51) 4690,3053.51 4690,2890.01 ; L27.2@4460.43,2990.01 4590,2990.01 cw(c4590,2890.01) 4690,2890.01
NetL14_1: L14.1 U14.11 | length 245.2
  Top Layer w11.3: U14.11@2630.91,2760.35 2631.56,2761 2646.33,2761 2778.93,2893.6 L14.1@2820.93,2893.6
NetL14_2: L14.2 L16.1 | length 160
  Top Layer w11.3: L14.2@2820.93,2957.6 2874.28,2958.93 2927.58,2958.93 L16.1@2980.93,2959.6
NetL15_1: L15.1 R31.2
NetL15_3: L15.3 R29.1
NetL15_4: L15.4 R30.2 | length 78.5
  Top Layer w11.3: R30.2@5682.6,2455 5751.34,2455 ccw(c5751.34,2461.22) L15.4@5757.56,2461.22
NetL17_1: L17.1 U16.11 | length 296.1
  Top Layer w11.3: U16.11@3420.43,2825.35 3421.08,2826 3444.43,2826 3603.43,2985.01 L17.1@3650.43,2985.01
NetL17_2: L17.2 L19.1 | length 160
  Top Layer w11.3: L17.2@3650.43,3056.01 L19.1@3810.43,3056.01
NetL19_2: L19.2 L24.1 | length 160
  Top Layer w11.3: L19.2@3810.43,2985.01 L24.1@3970.43,2985.01
NetL24_2: L24.2 L25.1 | length 166.4
  Top Layer w11.3: L24.2@3970.43,3056.01 4131.93,3056.01 L25.1@4135.43,3052.51
NetL25_2: L25.2 L26.1 | length 160
  Top Layer w11.3: L25.2@4135.43,2988.51 L26.1@4295.43,2988.51
NetL26_2: L26.2 L27.1 | length 168.5
  Top Layer w11.3: L26.2@4295.43,3052.51 4303.93,3061.01 L27.1@4460.43,3061.01
NetL28_1: L28.1 U14.10 | length 195.4
  Top Layer w11.3: U14.10@2630.91,2740.66 2765.99,2740.66 2778.93,2753.6 L28.1@2820.93,2753.6
NetL30_1: L30.1 U16.10 | length 235.9
  Top Layer w11.3: U16.10@3420.43,2805.66 3589.09,2805.66 3603.43,2820.01 L30.1@3650.43,2820.01
NetL30_2: L30.2 L31.1 | length 160
  Top Layer w11.3: L30.2@3610.43,2891.01 L31.1@3770.43,2891.01
NetL31_2: L31.2 L32.1 | length 160.6
  Top Layer w11.3: L31.2@3770.43,2820.01 3928.93,2820.01 L32.1@3930.43,2818.51
NetL33_1: L33.1 U20.12 | length 341
  Top Layer w11.3: U20.12@5099.93,2911.03 5237.58,3162.25 L33.1@5290.93,3173.6
NetL33_2: L33.2 L35.2 L36.1 L37.2 U20.9 | length 1888.1
  Top Layer w11.3: U20.9@5099.93,2851.98 5636.48,2851.98 ccw(c5636.48,2860.5) L36.1@5645,2860.5 ; L37.2@5290.93,2947.6 5557.9,2947.6 cw(c5557.9,2860.5) L36.1@5645,2860.5 ; L33.2@5290.93,3237.6 5545,3237.6 cw(c5545,3137.6) 5645,3137.6 5645,2928.6 ; L35.2@5455.93,3028.6 5545,3028.6 cw(c5545,2928.6) 5645,2928.6 ; L36.1@5645,2860.5 5645,2928.6
NetL34_1: L34.1 U20.11 | length 244.9
  Top Layer w11.3: U20.11@5099.93,2891.35 5114.52,2894.67 ccw(c5111.93,2906.03) 5120.24,2897.86 5238.58,3018.16 L34.1@5291.93,3029.51
NetL34_2: L34.2 L35.1 | length 164
  Top Layer w11.3: L34.2@5291.93,3093.51 5345.28,3092.9 5402.58,3092.9 L35.1@5455.93,3092.6
NetL37_1: L37.1 U20.10 | length 197.8
  Top Layer w11.3: U20.10@5099.93,2871.66 5278.99,2871.66 ccw(c5278.99,2883.6) L37.1@5290.93,2883.6
NetR3_1: R3.1 R6.2 U2.8
NetR4_2: R4.2 U2.9
NetR5_2: R5.2 U2.6
NetR8_2: R8.2 R11.1 R15.2 U10.6
NetR14_1: R14.1 U1.4 U10.3
NetR14_2: R14.2 U2.4
NetR18_2: R18.2 U4.13
NetR19_2: R19.2 U4.14
NetR20_1: R20.1 U4.15
NetR22_1: R22.1 U4.16
NetR24_2: R24.2 U4.4
NetR26_1: R26.1 R32.2 R33.2
NetR32_1: R32.1 U1.27
NetR34_2: R34.2 U1.11
NetR35_2: R35.2 U4.3
NetR36_2: R36.2 U4.2
NetR50_1: R50.1 U8.5
NetR50_2: R50.2 U4.12
NetR58_2: R58.2 U9.10 U9.11
NetR59_2: R59.2 U9.4 U9.5 U9.6
NetU1_9: U1.9 U3.3 Y1.1
NetU1_14: U1.14 U19.1
NetU1_17: U1.17 U11.2
NetU1_18: U1.18 U6.2
NetU1_19: U1.19 U11.1
NetU1_20: U1.20 U19.2
NetU1_21: U1.21 U6.1
NetU4_9: U4.9 Y1.3
NetU6_12: U6.12 U16.4
NetU6_13: U6.13 U16.3
NetU6_14: U6.14 U16.2
NetU6_15: U6.15 U16.1
NetU11_12: U11.12 U14.4
NetU11_13: U11.13 U14.3
NetU11_14: U11.14 U14.2
NetU11_15: U11.15 U14.1
NetU19_12: U19.12 U20.4
NetU19_13: U19.13 U20.3
NetU19_14: U19.14 U20.2
NetU19_15: U19.15 U20.1
NRST: J2.4 R2.1 U1.6
PA1_VDD: R15.1 R17.2
PA2_OUT: C40.2 R13.2 R41.2 | length 152.7
  Top Layer w11.3: R13.2@2230,2617.6 C40.2@2230,2693.13 ; R13.2@2232.6,2615 R41.2@2309.8,2615
ShuntCap: C29.1 C45.2 L29.2 | length 279.6
  Top Layer w11.3: L29.2@4690,2724.5 4806.98,2724.5 ccw(c4806.98,2737.96) C45.2@4820.43,2737.96 4958.08,2737.96 cw(c4958.08,2735.51) C29.1@4960.53,2735.51
SWCLK: J2.5 U1.23
SWDIO: J2.6 U1.22
UART_Rx: J1.5 U1.1
UART_Tx: J1.6 U1.2
VBAT: C6.2 C19.1 C61.1 C62.1 C63.1 C64.1 C65.1 C66.1 C67.1 C68.1 C69.1 C70.1 L1.1 R4.1 R55.2 SW1.3 U2.3 U5.5 U5.6 | length 212.3
  Top Layer w10: U5.6@180.2,3369.05 U5.5@217.6,3369.05 230,3381.45 230,3431.09 242.96,3444.05 C19.1@245.41,3444.05 ; v1(1462.6,3620) 1466.39,3620 1471.26,3615.13 U2.3@1547.56,3615.13
  other v1: 425,3390 268.72,3445.1 730,3560 830,3560 930,3560 1030,3560 1130,3560 730,3615 830,3615 930,3615 1030,3615 1130,3615 1327.6,3625 555,3690 1510,3730
pads on no net: D3.2 J2.8 SW1.1 SW1.4 SW1.5 SW1.6 U1.5 U1.10 U1.12 U1.13 U3.5 U4.1 U4.17 U4.26 U4.27 U4.28 U5.4 U6.7 U6.9 U6.10 U6.11 U8.6 U10.5 U11.7 U11.9 U11.10 U11.11 U19.7 U19.9 U19.10 U19.11

## Polygon pours and split planes (outlines as drawn)
3V3MN on Power "GND" (solid, pour order 9): 1145,1825 1145,2320 2330,2320 2330,3875 6500,3875 6490,3865 6490,1805
no net on Power "GND" (solid, pour order 7): 1620,3890 1620,3290 1150,3290 1150,2345 2275,2345 2275,3890
3V3MCU on Power "GND" (solid, pour order 5): 270,2385 270,1820 1125,1820 1125,2392.11
3V3DDS on Power "3V3DDS" (solid, pour order 4): 700,3290 700,3105 695,3110 265,3110 265,2400 267.13,2402.13 1095.5,2402.13 1095.5,3289.5 1095,3290
3V3 on Power "3V3" (solid, pour order 3): 10,3290 690,3290 690,3120 255,3120 255,2040 16.1,2040
VBAT on Power "GND" (solid, pour order 0): -5,3905 -5,3315 1595,3315 1595,3910.14
GND on GND "GND" (solid, pour order 1): -5,3905 -5,1680 0,1685 6510,1685 6510,3900

## Keep-outs
Keep-Out Layer:
  the board outline again, w10

## Text inside footprints (layer, text, board x,y; h text height)
U1: Top 3D Body "*" at 723.75,2216.48 h40; Top Overlay "*" at 672,2261.97 h40
U14: Top 3D Body "*" at 2510.41,2764.88 h50; Top Overlay "*" at 2461.41,2764.88 h50
U16: Top 3D Body "*" at 3299.93,2829.88 h50; Top Overlay "*" at 3250.93,2829.88 h50
U20: Top 3D Body "*" at 4979.43,2895.88 h50; Top Overlay "*" at 4930.43,2895.88 h50